# EAGLE board weather_station (EAGLE 9.6.2)
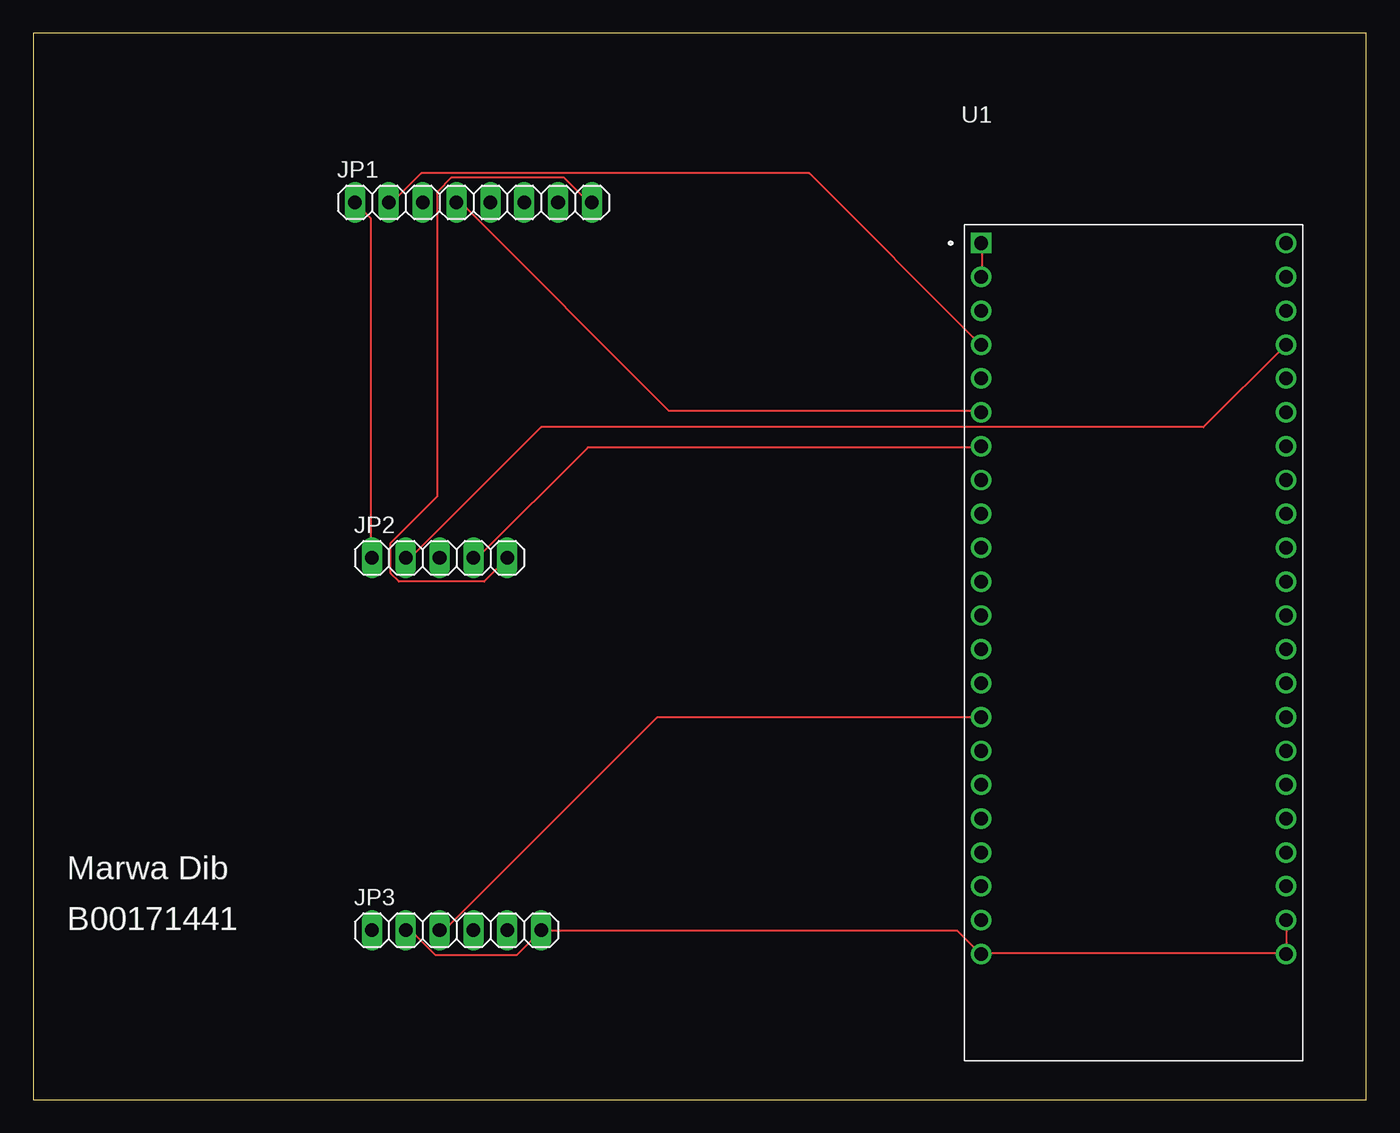
[diagram p0: board, top side]
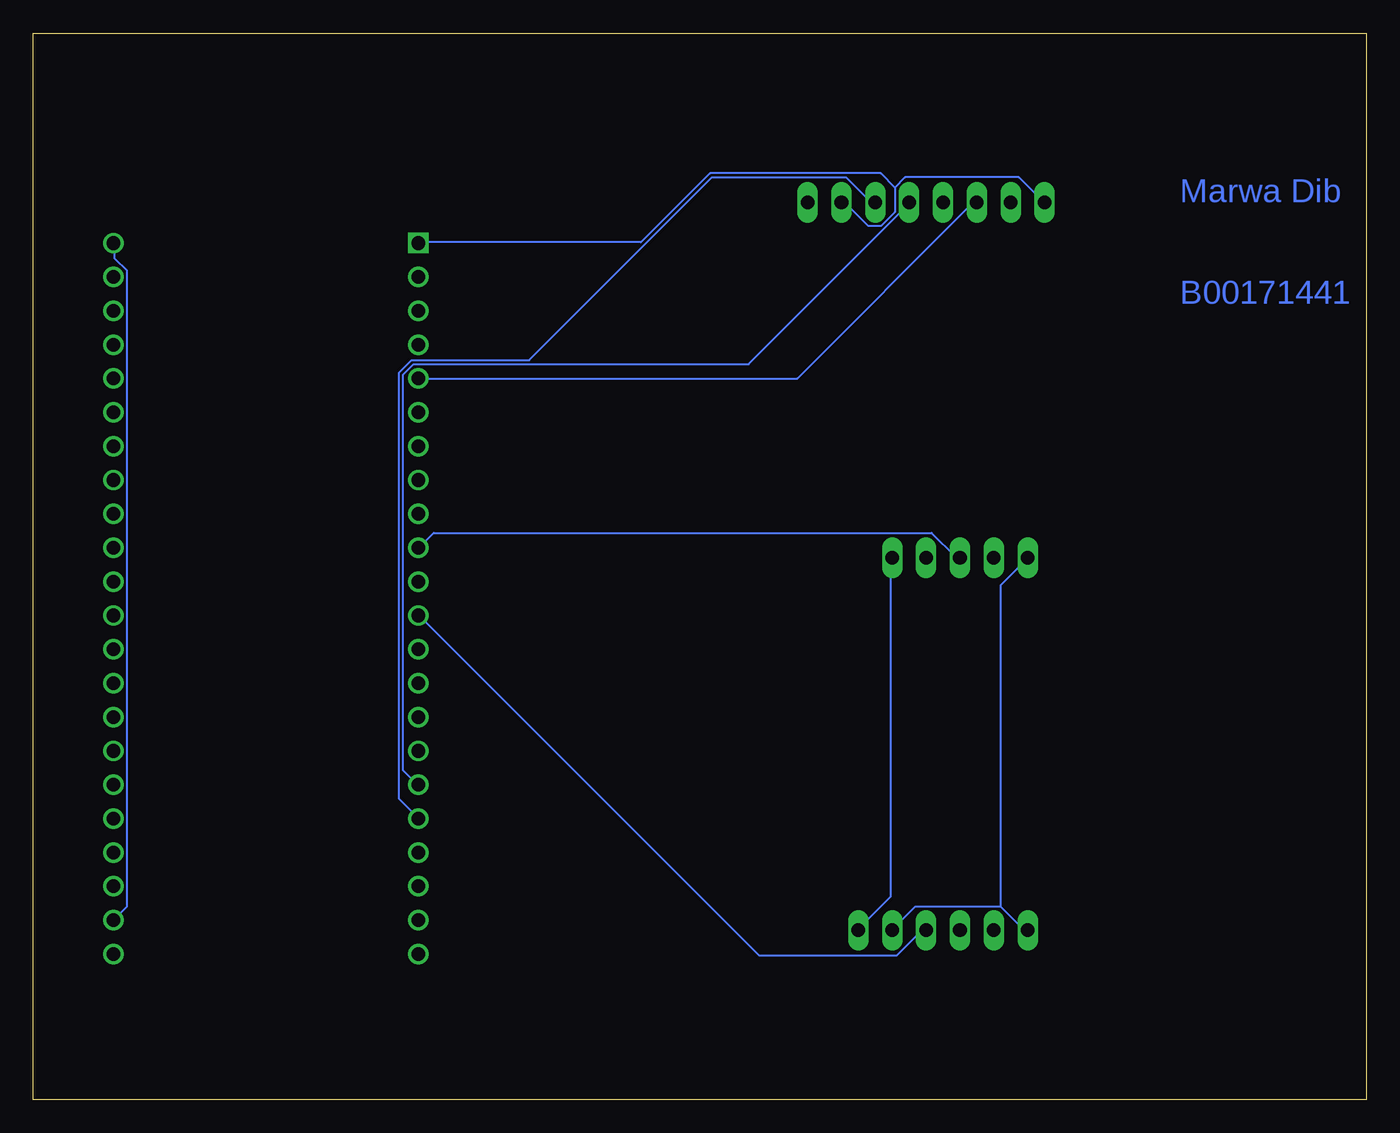
[diagram p1: board, bottom side, seen from below]

Size 100 x 80 mm. Coordinates in mm from the lower left corner, seen from the top.
Outline: 0,0 100,0 100,80 0,80 0,0
Copper layers (1*16): Top 0.035mm / dielectric 1.5mm / Bottom 0.035mm
Design rules "default": minimum track width 6mil, minimum drill 0.35mm, track to track 6mil, track to pad 6mil, pad to pad 6mil, via to via 6mil, smd to smd 6mil, copper to edge 40mil, drill to drill 6mil, minimum pad ring 10mil, minimum via ring 8mil, stop-mask expansion 4mil, vias tented up to drill 0mil, thermal gap 10mil

## Footprints (pad centres in the part's own frame; a part is rotated, then mirrored left to right if it is on the bottom)
1X08 = drill 1.016 long: 1 -8.89,0; 2 -6.35,0; 3 -3.81,0; 4 -1.27,0; 5 1.27,0; 6 3.81,0; 7 6.35,0; 8 8.89,0
1X05 = drill 1.016 long: 1 -5.08,0; 2 -2.54,0; 3 0,0; 4 2.54,0; 5 5.08,0
1X06 = drill 1.016 long: 1 -6.35,0; 2 -3.81,0; 3 -1.27,0; 4 1.27,0; 5 3.81,0; 6 6.35,0
XCVR_ESP32-S3-DEVKITC-1-N8R2 = drill 1.02 square: J1_1 -11.43,29.97 | drill 1.02: J1_2 -11.43,27.43; J1_3 -11.43,24.89; J1_4 -11.43,22.35; J1_5 -11.43,19.81; J1_6 -11.43,17.27; J1_7 -11.43,14.73; J1_8 -11.43,12.19; J1_9 -11.43,9.65; J1_10 -11.43,7.11; J1_11 -11.43,4.57; J1_12 -11.43,2.03; J1_13 -11.43,-0.51; J1_14 -11.43,-3.05; J1_15 -11.43,-5.59; J1_16 -11.43,-8.13; J1_17 -11.43,-10.67; J1_18 -11.43,-13.21; J1_19 -11.43,-15.75; J1_20 -11.43,-18.29; J1_21 -11.43,-20.83; J1_22 -11.43,-23.37; J3_1 11.43,29.97; J3_2 11.43,27.43; J3_3 11.43,24.89; J3_4 11.43,22.35; J3_5 11.43,19.81; J3_6 11.43,17.27; J3_7 11.43,14.73; J3_8 11.43,12.19; J3_9 11.43,9.65; J3_10 11.43,7.11; J3_11 11.43,4.57; J3_12 11.43,2.03; J3_13 11.43,-0.51; J3_14 11.43,-3.05; J3_15 11.43,-5.59; J3_16 11.43,-8.13; J3_17 11.43,-10.67; J3_18 11.43,-13.21; J3_19 11.43,-15.75; J3_20 11.43,-18.29; J3_21 11.43,-20.83; J3_22 11.43,-23.37

## Placement (x,y rotation side)
JP1  [1X08]  33.02,67.31 0 top
JP2  [1X05]  30.48,40.64 0 top
JP3  [1X06]  31.75,12.7 0 top
U1  ESP32-S3-DEVKITC-1-N8R2  [XCVR_ESP32-S3-DEVKITC-1-N8R2]  82.55,34.29 0 top

## Library data of the parts
JP1-JP3 = pinhead
U1 = ESP32-S3-DEVKITC-1-N8R2; DATASHEET_URL: https://s3.amazonaws.com/snapeda/datasheet/ESP32-S3-DEVKITC-1-N8R2_Espressif_Systems.pdf; DESCRIPTION: WiFi Development Tools - 802.11 ESP32-S3 general-purpose development board, embeds ESP32-S3-WROOM-1-N8R2, with pin header; MANUFACTURER: Espressif Systems; MPN: ESP32-S3-DEVKITC-1-N8R2; PARTREV: V1; SOURCE_URL: https://www.snapeda.com/parts/ESP32-S3-DEVKITC-1-N8R2/Espressif+Systems/view-part/; STANDARD: Manufacturer Recommendations

## Nets
5V0: U1.J1_21
J_TFT: JP1.3 U1.J1_5
N$1: JP1.2 U1.J1_4
N$3: JP1.4 U1.J1_6
N$4: JP1.5 U1.J1_17
N$5: JP3.3 U1.J1_15
N$6: JP1.8 JP2.5 JP3.2 JP3.6 U1.J1_22 U1.J3_1 U1.J3_21 U1.J3_22
N$7: JP1.1 JP1.7 JP2.1 JP3.1 JP3.5 U1.J1_1 U1.J1_2
N$8: JP2.3 U1.J1_10
N$9: JP2.4 U1.J1_7
N$10: JP1.6 U1.J1_18
N$11: JP2.2 U1.J3_4
N$13: JP3.4 U1.J1_12

## Tracks (layer width: path | path; a pad name or v marks a point on that pad's centre or on a via)
J_TFT
  Bottom 0.152: JP1.3 29.26,67.21 29.57,67.21 42.67,54.1 71.02,54.1 U1.J1_5
N$1
  Top 0.152: JP1.2 26.67,67.36 26.98,67.36 29.11,69.49 58.22,69.49 71.02,56.69 U1.J1_4
N$3
  Top 0.152: JP1.4 31.85,67.21 32.16,67.21 47.7,51.66 71.02,51.66 U1.J1_6
N$4
  Bottom 0.152: JP1.5 34.29,67.21 46.33,55.17 71.48,55.17 72.24,54.41 72.24,24.69 71.17,23.62 U1.J1_17
N$5
  Top 0.152: JP3.3 30.48,12.8 30.94,12.8 46.79,28.65 71.02,28.65 U1.J1_15
N$6
  Top 0.152: 38.1,12.65 36.27,10.82 30.18,10.82 28.35,12.65 28.04,12.65 JP3.2 | JP1.8 41.91,67.36 41.6,67.36 39.78,69.19 31.39,69.19 30.33,68.12 30.33,45.26 26.82,41.76 26.82,39.47 27.43,38.86 33.83,38.86 35.51,40.54 JP2.5 | U1.J3_21 94.03,13.41 94.03,10.97 U1.J3_22 93.88,10.97 71.17,10.97 U1.J1_22 71.02,10.97 69.34,12.65 38.1,12.65 | 38.1,12.65 JP3.6
  Bottom 0.152: JP2.5 35.66,40.54 35.66,15.24 38.1,12.8 JP3.6 | U1.J3_1 93.88,64.16 93.88,63.09 92.96,62.18 92.96,14.48 93.88,13.56 U1.J3_21
N$7
  Top 0.152: U1.J1_2 71.17,61.72 71.17,64.16 U1.J1_1 | JP1.1 25.3,66.14 25.3,40.69 JP2.1
  Bottom 0.152: 27.43,14.48 25.76,12.8 25.45,12.8 JP3.1 | 27.43,14.48 33.83,14.48 35.51,12.8 JP3.5 | 35.36,68.43 35.36,66.6 36.42,65.53 37.34,65.53 39.01,67.21 39.32,67.21 JP1.7 | 35.36,68.43 34.59,69.19 26.06,69.19 24.23,67.36 JP1.1 | 35.36,68.43 36.42,69.49 49.23,69.49 54.41,64.31 71.02,64.31 U1.J1_1 | 27.43,14.48 27.43,38.56 25.45,40.54 JP2.1
N$8
  Bottom 0.152: JP2.3 30.48,40.69 30.79,40.69 32.61,42.52 69.95,42.52 71.02,41.45 U1.J1_10
N$9
  Top 0.152: JP2.4 33.07,40.69 33.38,40.69 41.6,48.92 71.02,48.92 U1.J1_7
N$10
  Bottom 0.152: JP1.6 36.88,67.36 37.19,67.36 39.01,69.19 49.07,69.19 62.79,55.47 71.63,55.47 72.54,54.56 72.54,22.55 71.17,21.18 U1.J1_18
N$11
  Top 0.152: JP2.2 28.04,40.69 28.35,40.69 38.1,50.44 87.78,50.44 93.88,56.54 U1.J3_4
N$13
  Bottom 0.152: JP3.4 33.07,12.65 33.38,12.65 35.2,10.82 45.57,10.82 71.02,36.27 U1.J1_12

## Text on the board
Bottom: Marwa Dib | B00171441
tPlace: Marwa Dib | B00171441